# Altium PCB ELF 2 & ELF 2_Lite V1.3.PcbDoc (part 3 of 8)
Units mm, origin at the board's own origin, x right, y up, seen from the top; angles counter-clockwise.
Board outline 120 x 75 mm, 4 copper layers (01 TOP, 02 GND, 03 Signal, 04 BOT), stack 0.603 mm thick; 470 components, 412 nets, 2075 pads, 1565 vias.
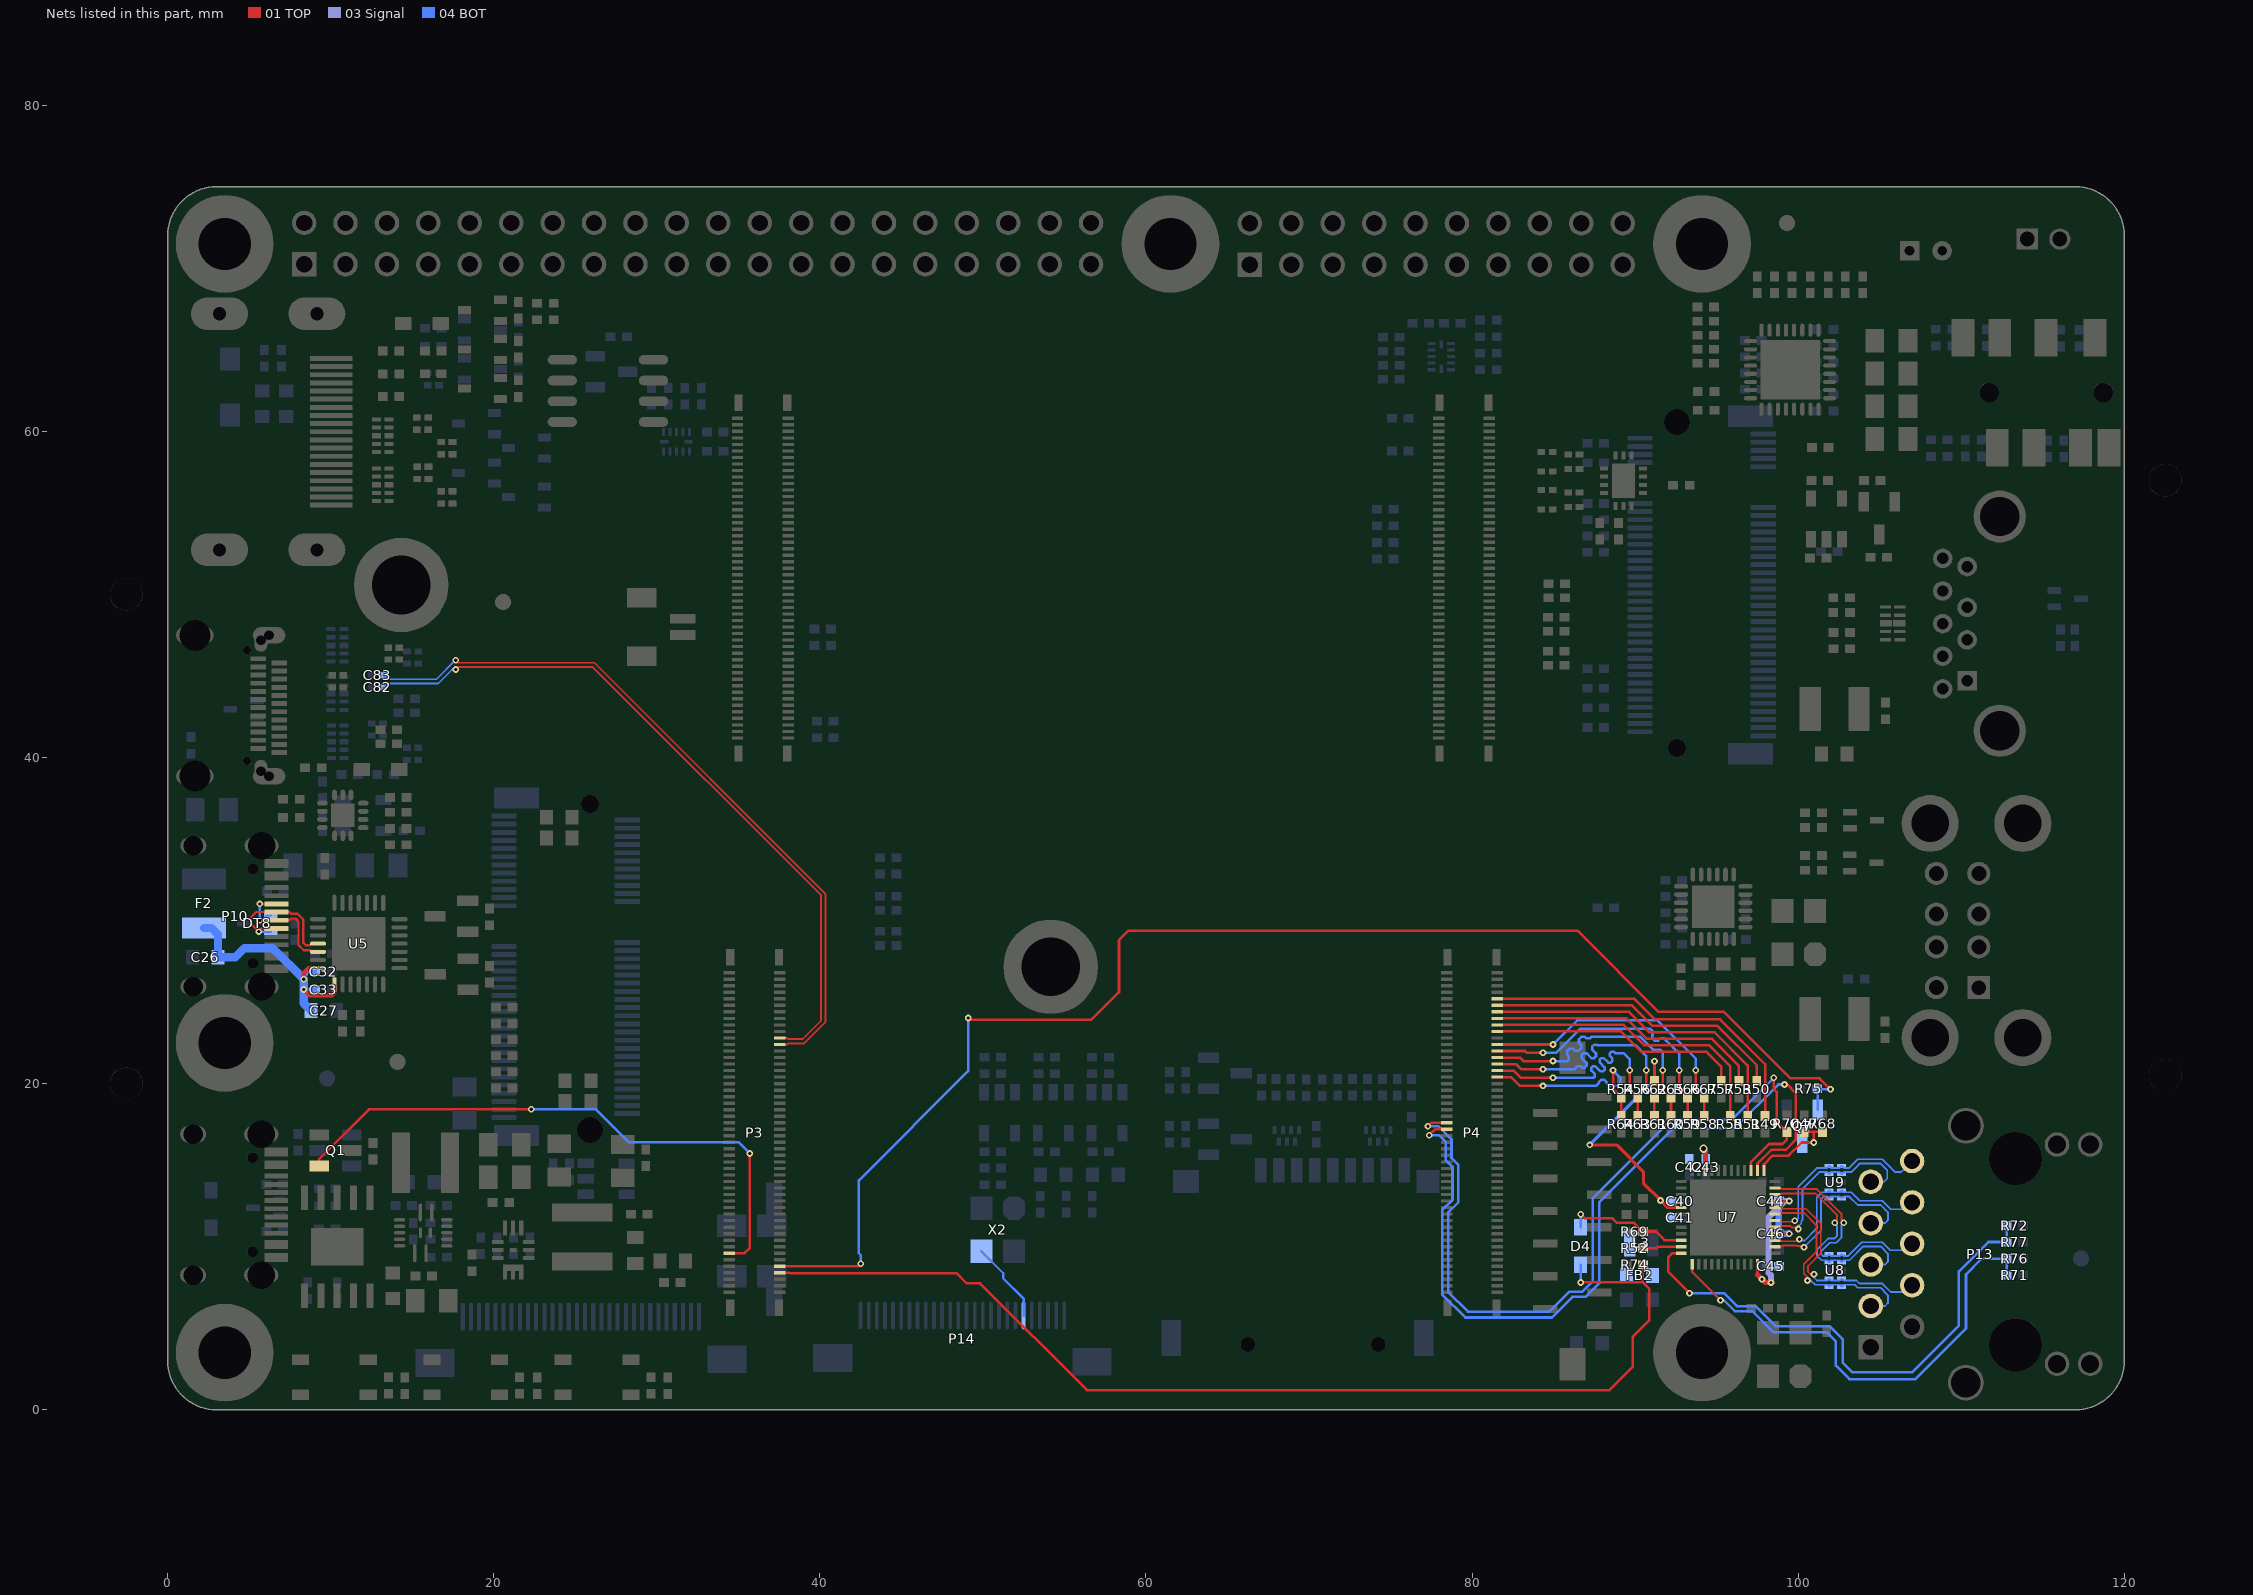
[diagram p4: the nets of this part, all layers, seen from the top]

## Via types
v1: diameter 0.406, hole 0.203, 01 TOP to 04 BOT, tented both sides, 1349 vias
v2: diameter 0.508, hole 0.305, 01 TOP to 04 BOT, tented both sides, 173 vias
v3: diameter 0.6, hole 0.3, 01 TOP to 04 BOT, tented both sides, 34 vias
v4: diameter 0.6, hole 0.3, 01 TOP to 04 BOT, 9 vias

## Nets (pads, with @x,y where several pads share a name; then routed paths per layer and width w, separated by ;. In a path a pad name is that pad's centre, name@x,y a point inside that pad or via, vN(x,y) a via of type N, cw(c..) or ccw(c..) an arc to the next point about the centre after c; other vN are vias at no path point) (continued)
GMAC0_RXD0_M0: (continued)
  04 BOT w0.156: v1(84.348,20.876) 85.724,20.876 86.267,20.876 86.464,21.073 86.639,21.073 86.726,20.987 86.9,20.987 87.016,21.103 87.016,21.277 86.711,21.582 86.711,21.756 86.827,21.872 87.001,21.872 87.306,21.567 87.48,21.567 87.596,21.683 87.596,21.857 87.36,22.093 87.36,22.267 87.476,22.383 87.651,22.383 87.673,22.361 88.023,22.361 90.016,22.361 90.673,21.704 v1(90.673,20.811)
GMAC0_RXD1_M0: P4.28 R60.1 R65.1 | length 16.5
  01 TOP w0.156: P4.28@81.55,21.6 82.927,21.6 83.143,21.384 v1(84.961,21.384) ; v1(91.689,20.811) 91.689,19.643 R65.1@92.197,19.135 R60.1@92.197,18.017
  04 BOT w0.156: v1(84.961,21.384) 85.835,21.384 85.867,21.416 85.923,21.471 85.923,21.689 85.831,21.781 85.831,21.998 85.976,22.143 86.193,22.143 86.318,22.017 86.535,22.017 86.68,22.162 86.68,22.379 86.555,22.505 86.555,22.722 86.7,22.867 86.917,22.867 87.009,22.775 87.226,22.775 87.32,22.869 87.491,22.869 90.317,22.869 91.058,22.128 91.113,22.073 91.331,22.073 91.548,22.073 91.693,21.928 91.693,21.711 91.689,21.707 91.689,20.869 v1(91.689,20.811)
GMAC0_RXD2_M0: P4.26 R59.1 R66.1 | length 16.9
  01 TOP w0.156: P4.26@81.55,22 83.255,22 83.363,21.892 v1(84.348,21.892) ; v1(92.705,20.811) 92.705,19.643 R66.1@93.213,19.135 R59.1@93.213,18.017
  04 BOT w0.156: v1(84.348,21.892) 85.153,21.892 86.638,23.377 90.597,23.377 90.907,23.377 91.061,23.223 91.061,23.006 91.046,22.991 91.046,22.774 91.19,22.629 91.408,22.629 91.56,22.781 91.777,22.781 92.243,22.315 92.298,22.259 92.705,21.853 v1(92.705,20.811)
GMAC0_RXD3_M0: P4.24 R58.1 R67.1 | length 17.5
  01 TOP w0.156: P4.24@81.55,22.4 v1(84.961,22.4) ; v1(93.721,20.811) 93.721,19.643 R67.1@94.229,19.135 R58.1@94.229,18.017
  04 BOT w0.156: v1(84.961,22.4) 86.446,23.885 91.361,23.885 93.721,21.525 v1(93.721,20.811)
GMAC0_TXCLK_M0: P4.20 R57.1 | length 15.5
  01 TOP w0.156: P4.20@81.55,23.2 89.134,23.2 90.392,21.942 94.382,21.942 95.27,21.054 R57.1@95.27,20.151
GMAC0_TXCTL_M0: P4.18 R55.1 | length 18.4
  01 TOP w0.156: P4.18@81.55,23.6 89.3,23.6 90.558,22.342 94.548,22.342 95.821,21.068 R55.1@95.821,18.017
GMAC0_TXD0_M0: P4.16 R53.1 | length 17
  01 TOP w0.156: P4.16@81.55,24 89.465,24 90.724,22.742 94.714,22.742 96.362,21.093 R53.1@96.362,20.151
GMAC0_TXD1_M0: P4.14 R51.1 | length 19.8
  01 TOP w0.156: P4.14@81.55,24.4 89.631,24.4 90.889,23.142 94.879,23.142 96.896,21.125 R51.1@96.896,18.017
GMAC0_TXD2_M0: P4.12 R50.1 | length 18.4
  01 TOP w0.156: P4.12@81.55,24.8 89.797,24.8 91.055,23.542 95.045,23.542 97.455,21.132 R50.1@97.455,20.151
GMAC0_TXD3_M0: P4.10 R49.1 | length 21.2
  01 TOP w0.156: P4.10@81.55,25.2 89.962,25.2 91.221,23.942 95.211,23.942 97.963,21.19 R49.1@97.963,18.017